# Altium PCB DCF-ECU.PcbDoc
Units mil, origin at the board's own origin, x right, y up, seen from the top; angles counter-clockwise.
Board outline 4560 x 7585 mil, 4 copper layers (Top Layer, GND, 3.3V, Bottom Layer), stack 23.756 mil thick; 22 components, 29 nets, 210 pads, 10 vias.
Unrouted connection lines stored in the file: 2.
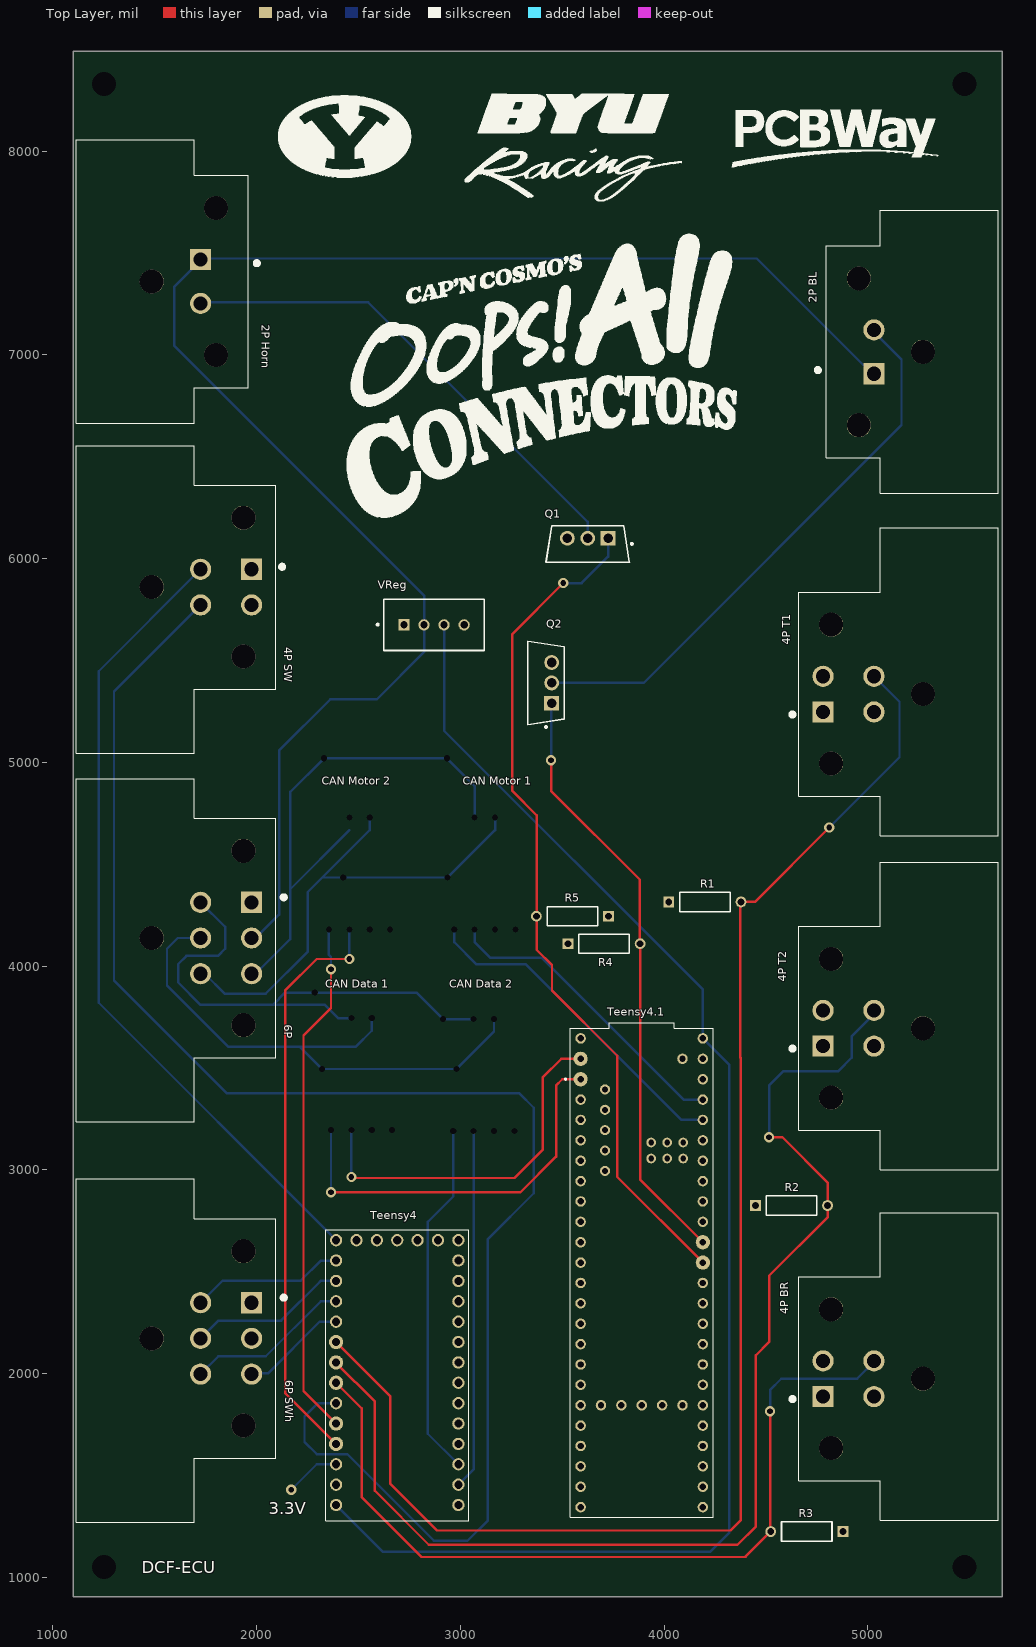
[diagram p0: Top Layer view]
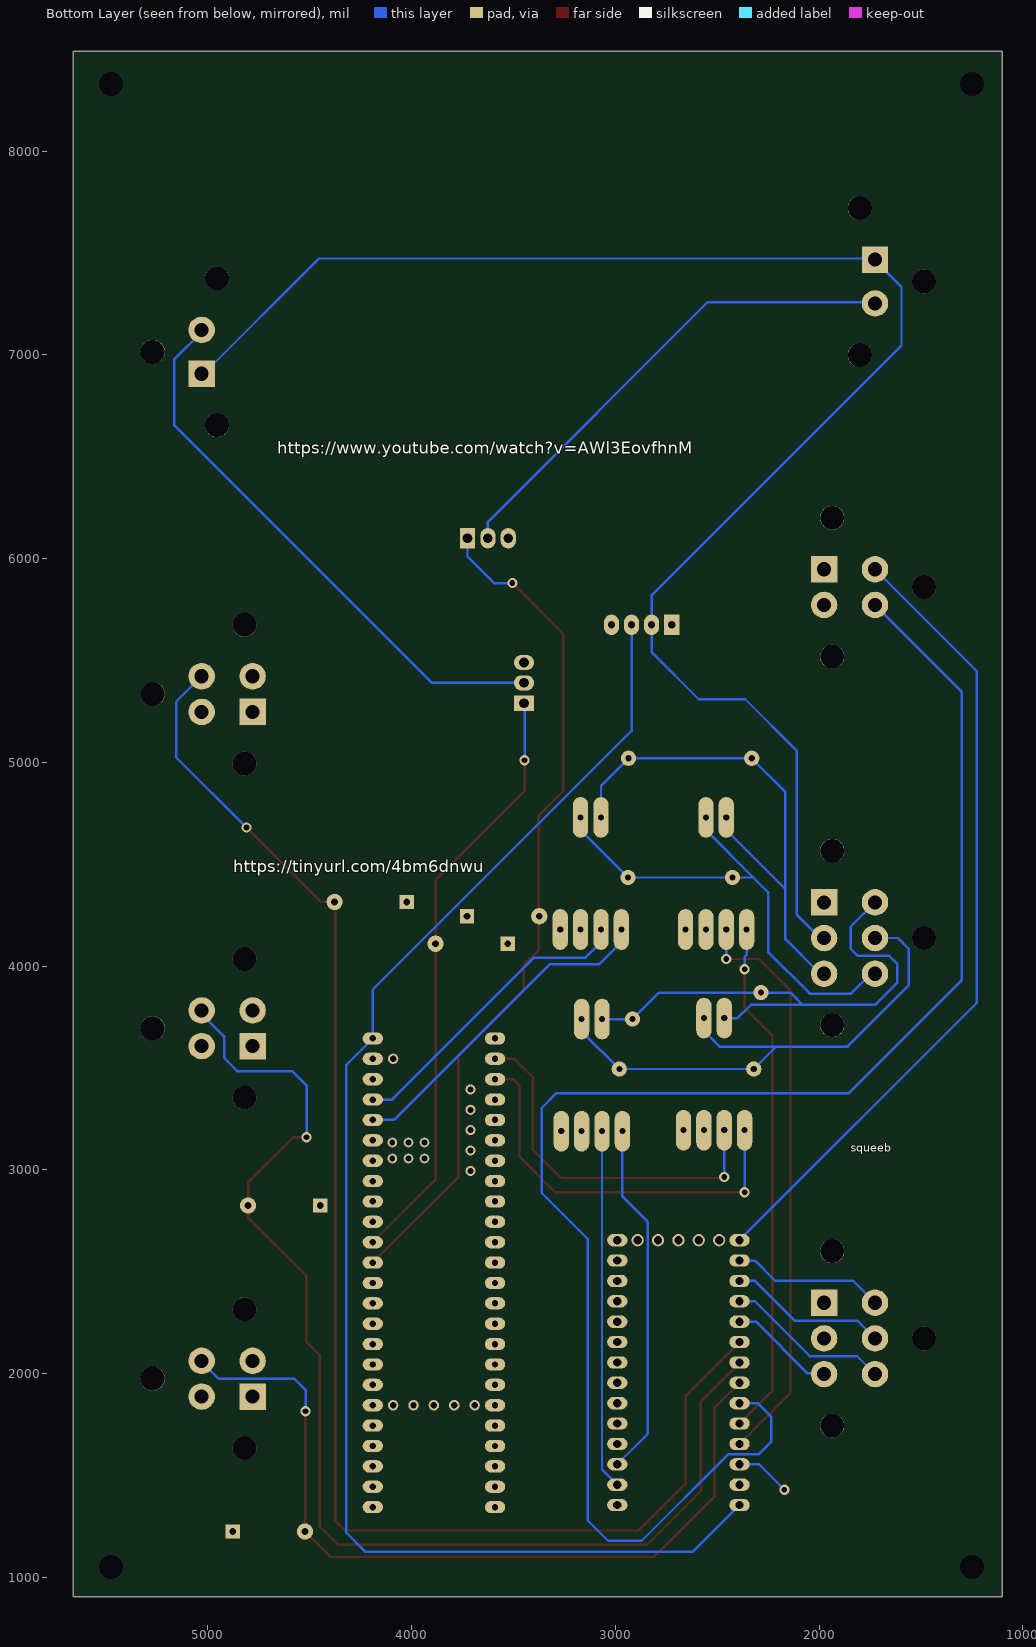
[diagram p1: Bottom Layer view, seen from below]
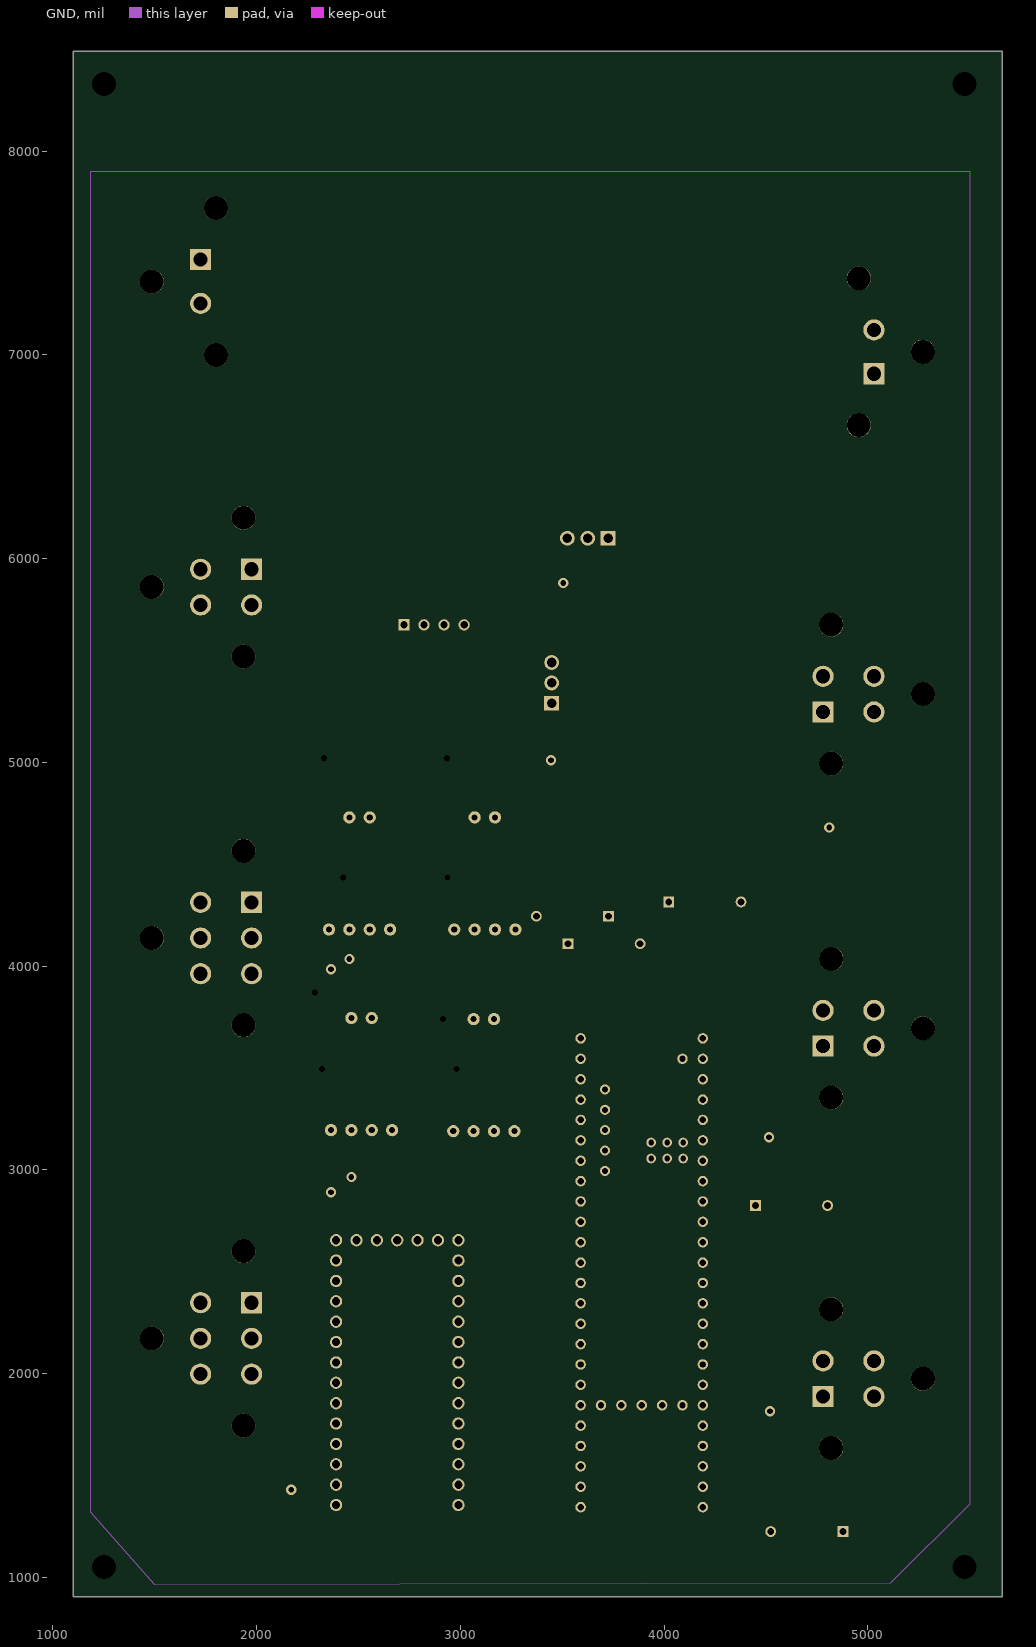
[diagram p2: GND]
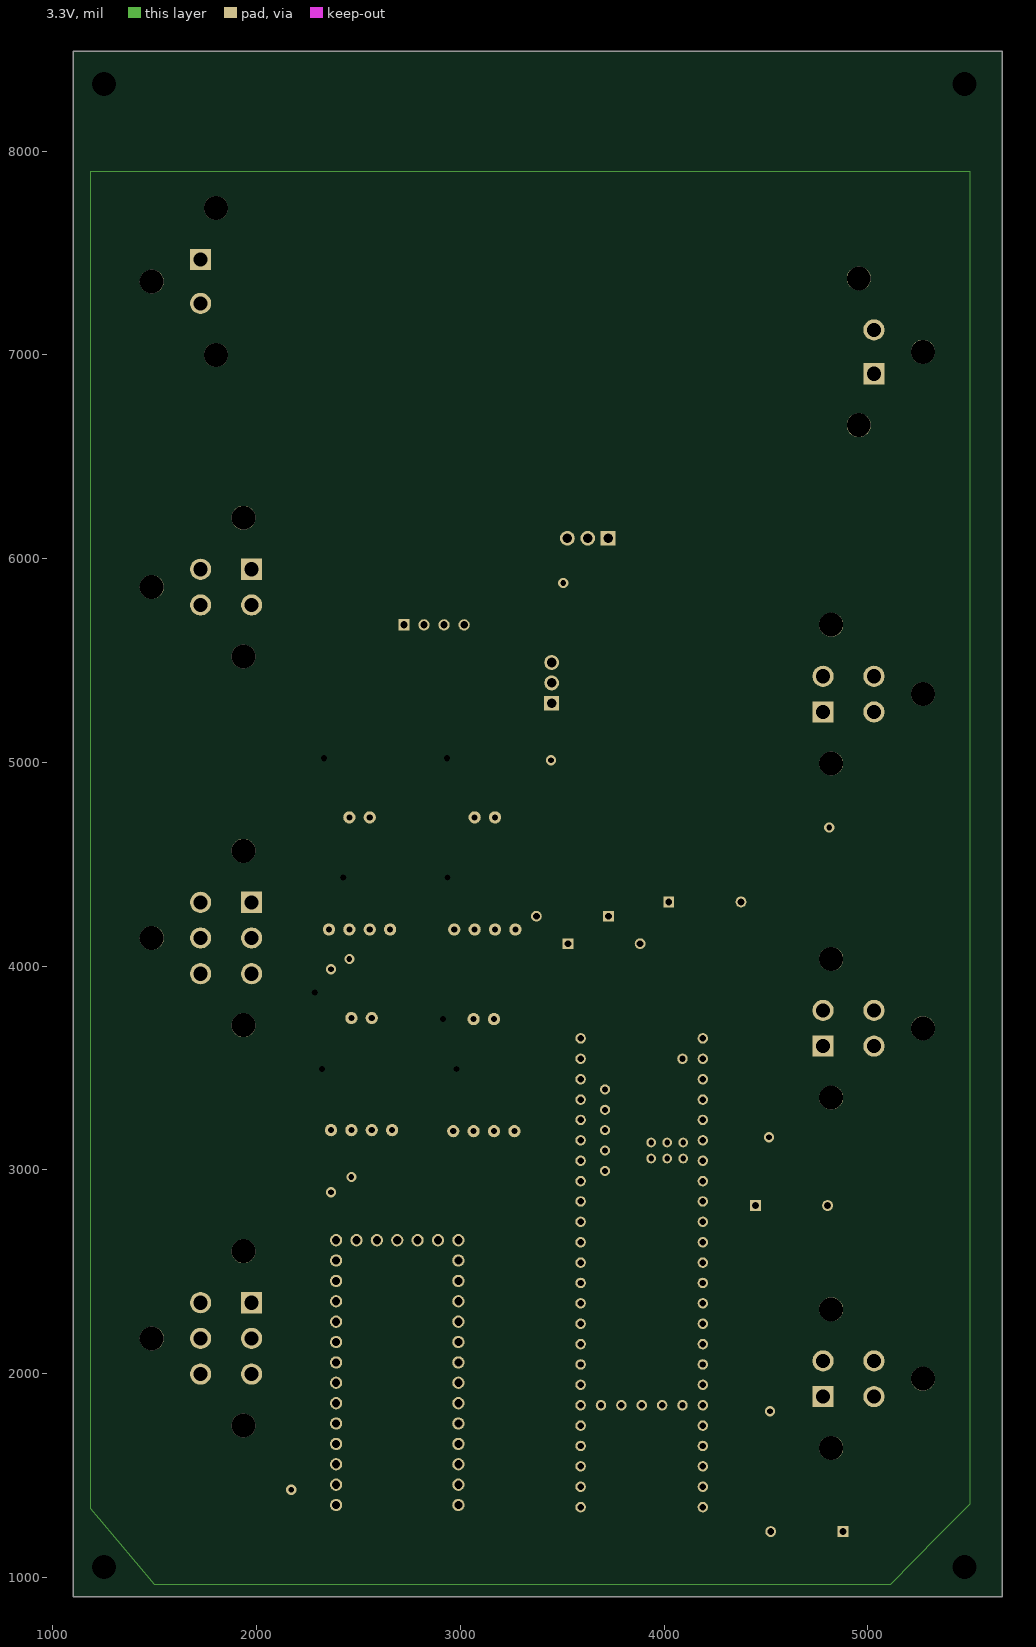
[diagram p3: 3.3V]

## Layer stack, top to bottom
Top Solder: solder mask 0.4, Solder Resist, Dk 3.5
Top Layer: signal copper 1.4
Dielectric 2: prepreg 2.8, PP-006, Dk 4.1
GND: signal copper 1.378
Dielectric 1: dielectric 12.6, FR-4, Dk 4.8
3.3V: signal copper 1.378
Dielectric 3: prepreg 2.8, PP-006, Dk 4.1
Bottom Layer: signal copper 1.4
Bottom Solder: solder mask 0.4, Solder Resist, Dk 3.5

## Board outline
1100,905 5660,905 5660,8490 1100,8490

## Design rules (kind name [scope] priority, off if disabled: settings)
Clearance [All] p1: gap=10 ignorepadtopadclearanceinfootprint=FALSE
HoleSize [All] p1: absolutevalues=TRUE maxlimit=200 minlimit=1 maxpercent=80.000 minpercent=20.000
PolygonConnect [All] p1: connectstyle=Relief reliefconductorwidth=10 reliefentries=4 polygonreliefangle="90 Angle" airgapwidth=10
RoutingVias [All] p1: holewidth=28 width=50 viastyle="Through Hole" minholewidth=28 minwidth=50 maxholewidth=28 maxwidth=50
SolderMaskExpansion [All] p1: expansion=4 istentingtop=FALSE
SupplyNets "Schematic Supply Nets" [InNet('GND')] p1: voltage=0.000
Width [All] p1: maxlimit=20 minlimit=10 preferedwidth=12 minimp=50.000000 maximp=50.000000 favimp=50.000000
29 further rules are at their usual default settings.

## Components (designator, comment, footprint, x,y, rotation, side; value= is the part's Value field where it differs from the comment)
"2P BL" "DT13-2P" TE_DT13-2P 5029.84,7015 r180 top
"2P Horn" "DT13-2P" TE_DT13-2P 1725.16,7360 r0 top
"4P BR" "DT13-4P" TE_DT13-4P 5029.84,1975 r180 top
"4P SW" "DT13-4P" TE_DT13-4P 1725.16,5860 r0 top
"4P T1" "DT13-4P" TE_DT13-4P 5029.84,5335 r180 top
"4P T2" "DT13-4P" TE_DT13-4P 5029.84,3695 r180 top
6P "DT13-6P" TE_DT13-6P 1725.16,4137.95 r0 top
"6P SWh" "DT13-6P" TE_DT13-6P 1725.16,2172.95 r0 top
"CAN Data 1" "CAN Module" "CAN Module-Footprint-1" 2665,3195 r90 top
"CAN Data 2" "CAN Module" "CAN Module-Footprint-1" 3265,3190 r90 top
"CAN Motor 1" "CAN Module" "CAN Module-Footprint-1" 3270,4180 r90 top
"CAN Motor 2" "CAN Module" "CAN Module-Footprint-1" 2655,4180 r90 top
Q1 "IRLZ44NPbF" FP-PG-TO220-3-MFG 3625,6072.24 r270 top
Q2 "IRLZ44NPbF" FP-PG-TO220-3-MFG 3420,5390 r180 top
R1 "MFR-25FBF5210K" RESA60-630X240 4200,4315 r0 top
R2 "MFR-25FBF5210K" RESA60-630X240 4625,2825 r0 top
R3 "MFR-25FBF5210K" RESA60-630X240 4700,1225 r180 top
R4 "MFR-25FBF5210K" RESA60-630X240 3705,4110 r0 top
R5 "MFR-25FBF5210K" RESA60-630X240 3550,4245 r180 top
Teensy4 "DEV-15583" MODULE_DEV-15583 2690,2005 r180 top
Teensy4.1 "DEV-16771" MODULE_DEV-16771 3890,2495 r270 top
VReg "B04B-XASK-1(LF)(SN)" FP-B04B-XASK-1_LF_SN-MFG 2870.79,5675 r180 top

## Footprints (in the part's own frame and the unit in brackets; to place one, negate y for a bottom-side part, rotate by r counter-clockwise, add the part's x,y. Pads: shape width x height; smd on the part's side, far side on the other; paste and mask are expansions set on the pad)
"CAN Module-Footprint-1" [mil]
  round 0 / inner round 60 / far side oval 200x75 hole 30: 1(0,300) 2(0,200) 3(0,100) 4(0,0) 5(550,200) 6(550,100)
FP-B04B-XASK-1_LF_SN-MFG [mm]
  rect 1.4x1.4 / inner rect 1.4x1.4 / far side rect 1.905x2.54 hole 0.9 paste-2539.97: 1(3.75,0)
  round 1.4 / inner round 1.4 / far side oval 1.905x2.54 hole 0.9 paste-2539.97 mask+0: 2(1.25,0) 3(-1.25,0) 4(-3.75,0)
  silkscreen extent -6.25,-3.2 7.15,3.2, body extent -6.35,-3.3 6.35,3.3, height 0.25
FP-PG-TO220-3-MFG [mm]
  rect 1.85x1.85 / inner rect 1.85x1.85 / far side rect 2.54x1.905 hole 1.2 paste-2539.97 mask+0: 1(-0.705,2.54)
  round 1.85 / inner round 1.85 / far side oval 2.54x1.905 hole 1.2 paste-2539.97 mask+0: 2(-0.705,0)
  round 1.85 / inner round 1.85 / far side oval 2.54x1.905 hole 1.2 paste-2539.97: 3(-0.705,-2.54)
  silkscreen extent -2.27,-5.2 2.27,5.63, body extent -2.37,-5.55 2.37,5.55, height 0.25
MODULE_DEV-15583 [mm]
  round 1.53 / inner round 1.53 / far side oval 2.54x1.53 hole 1.02: 0(-7.62,13.97) 1(-7.62,11.43) 2(-7.62,8.89) 3(-7.62,6.35) 3.3V_2(7.62,11.43) 4(-7.62,3.81) 5(-7.62,1.27) 6(-7.62,-1.27) 7(-7.62,-3.81) 8(-7.62,-6.35) 9(-7.62,-8.89) 10(-7.62,-11.43) 11(-7.62,-13.97) 12(-7.62,-16.51) 13(7.62,-16.51) 14(7.62,-13.97) 15(7.62,-11.43) 16(7.62,-8.89) 17(7.62,-6.35) 21(7.62,3.81) G1(-7.62,16.51) G3(7.62,13.97) VIN(7.62,16.51)
  round 1.53 hole 1.02: 3.3V_1(-2.54,-16.51) G2(0,-16.51) ON-OFF(5.08,-16.51) PGM(2.54,-16.51) VBAT(-5.08,-16.51)
  round 1.778 / inner round 1.53 / far side oval 2.54x1.524 hole 1.02: 18(7.62,-3.81) 19(7.62,-1.27) 20(7.62,1.27) 22(7.62,6.35) 23(7.62,8.89)
  silkscreen extent -8.89,-17.78 8.89,18.48
MODULE_DEV-16771 [mm]
  round 1.778 / inner round 1.308 / far side oval 1.524x2.54 hole 0.8: 0(-26.67,-7.62) 1(-24.13,-7.62) 15(-1.27,7.62) 16(-3.81,7.62)
  round 1.308 / inner round 1.308 / far side oval 1.524x2.54 hole 0.8: 2(-21.59,-7.62) 3(-19.05,-7.62) 3.3V_1(6.35,-7.62) 3.3V_2(-24.13,7.62) 4(-16.51,-7.62) 5(-13.97,-7.62) 6(-11.43,-7.62) 7(-8.89,-7.62) 8(-6.35,-7.62) 9(-3.81,-7.62) 10(-1.27,-7.62) 11(1.27,-7.62) 12(3.81,-7.62) 13(3.81,7.62) 14(1.27,7.62) 17(-6.35,7.62) 18(-8.89,7.62) 19(-11.43,7.62) 20(-13.97,7.62) 21(-16.51,7.62) 22(-19.05,7.62) 23(-21.59,7.62) 24(8.89,-7.62) 25(11.43,-7.62) 26(13.97,-7.62) 27(16.51,-7.62) 28(19.05,-7.62) 29(21.59,-7.62) 30(24.13,-7.62) 31(26.67,-7.62) 32(29.21,-7.62) 33(29.21,7.62) 34(26.67,7.62) 35(24.13,7.62) 36(21.59,7.62) 37(19.05,7.62) 38(16.51,7.62) 39(13.97,7.62) 40(11.43,7.62) 41(8.89,7.62) GND1(-29.21,-7.62) GND2(6.35,7.62) GND3(-26.67,7.62) VIN(-29.21,7.62)
  round 1.308 hole 0.8: 3.3V_3(16.51,-2.54) GND4(16.51,0) ON/OFF(16.51,5.08) PROGRAM(16.51,2.54) VBAT(16.51,-5.08) VUSB(-26.67,5.08)
  round 1.258 hole 0.75: 5V(-22.86,-4.57) D+(-17.78,-4.57) D-(-20.32,-4.57) USB_GND1(-15.24,-4.57) USB_GND2(-12.7,-4.57)
  round 1.208 hole 0.7: GND5(-14.24,3.17) LED(-16.24,3.17) R+(-16.24,5.17) R-(-14.24,5.17) T+(-14.24,1.17) T-(-16.24,1.17)
  silkscreen extent -31.18,-9.6 30.48,8.89, body extent -31.18,-8.89 30.48,8.89, height 7.15
RESA60-630X240 [mm] "Axial Resistor, 2-Leads, Dia 2.4mm, Body Length 6.3mm"
  rect 1.35x1.35 / inner rect 1.35x1.35 / far side rect 1.778x1.778 hole 0.85: 1(-4.5,0)
  round 1.35 / inner round 1.35 / far side round 2.032 hole 0.85: 2(4.5,0)
  silkscreen extent -3.15,-1.2 3.15,1.2, body extent -3.15,-1.2 3.15,1.2, height 2.4
TE_DT13-2P [mm]
  rect 2.64x2.64 / inner rect 2.64x2.64 / far side rect 3.302x3.302 hole 1.76: 1(0,2.73)
  round 2.64 / inner round 2.64 / far side round 3.302 hole 1.76: 2(0,-2.73)
  round 2.99 hole 2.99 unplated: ""(-6.1,0) ""(1.9,9.155) ""(1.9,-9.155)
  silkscreen extent -15.5,-17.65 7.25,17.65
TE_DT13-4P [mm]
  rect 2.64x2.64 / inner rect 2.64x2.64 / far side rect 3.302x3.302 hole 1.76: 1(6.35,2.225)
  round 2.64 / inner round 2.64 / far side round 3.302 hole 1.76: 2(6.35,-2.225) 3(0,-2.225) 4(0,2.225)
  round 2.99 hole 2.99 unplated: ""(-6.1,0) ""(5.33,8.65) ""(5.33,-8.65)
  silkscreen extent -15.5,-20.71 10.41,17.64
TE_DT13-6P [mm]
  rect 2.64x2.64 / inner rect 2.64x2.64 / far side rect 3.302x3.302 hole 1.76: 1(6.35,4.45)
  round 2.64 / inner round 2.64 / far side round 3.302 hole 1.76: 2(6.35,0) 3(6.35,-4.45) 4(0,-4.45) 5(0,0) 6(0,4.45)
  round 2.99 hole 2.99 unplated: ""(-6.1,0) ""(5.33,-10.87) ""(5.33,10.87)
  silkscreen extent -15.5,-22.93 10.61,19.87

## Part data
"2P BL" "2P Horn": "DT13 Series, 5.46mm Pitch 2 Way 1 Row Right Angle PCB Header, Solder Termination", Package=None, Availability=Unavailable, DigiKey-Purchase-URL=https://snapeda.com/shop?store=DigiKey&id=1788306, EU_RoHS_Compliance=Compliant, MF="TE Connectivity", MP=DT13-2P, Price=None, SnapEDA_Link=https://www.snapeda.com/parts/DT13-2P/TE%20Connectivity%20Deutsch%20Connectors/view-part/1788306/?ref=snap
"4P BR" "4P SW" "4P T1" "4P T2": "DT13 Series, 4.44mm Pitch 4 Way 2 Row Right Angle PCB Header, Solder Termination", Package=None, Availability=Unavailable, MF="TE Connectivity", MP=DT13-4P, Price=None, SnapEDA_Link=https://www.snapeda.com/parts/DT13-4P/TE%20Connectivity%20Deutsch%20Connectors/view-part/2708791/?ref=snap, TE_purchase_URL=https://www.te.com/usa-en/product-DT13-4P.html?te_bu=Cor&te_type=disp&te_campaign=seda_glo_cor-seda-global-disp-prtnr-fy19-seda-model-bom-cta_sma-317_1&elqCampaignId=32493
6P "6P SWh": "DT13 Series, 4.44mm Pitch 6 Way 2 Row Right Angle PCB Header, Solder Termination", Package=None, Availability=Unavailable, DigiKey-Purchase-URL=https://snapeda.com/shop?store=DigiKey&id=1897474, EU_RoHS_Compliance=Compliant, MF="TE Connectivity", MP=DT13-6P, Price=None, SnapEDA_Link=https://www.snapeda.com/parts/DT13-6P/TE%20Connectivity%20Deutsch%20Connectors/view-part/1897474/?ref=snap
"CAN Data 1" "CAN Data 2" "CAN Motor 1" "CAN Motor 2": library part CMP-00030-00003-1, "CAN waveshare"
Q1 Q2: library part CMP-32901-000488-1, "MOSFET N-CH 55V 47A TO220AB", Case/Package=TO-220, Continuous Drain Current (ID)=47A, Drain to Source Breakdown Voltage=55V, Drain to Source Resistance=35mR, Gate to Source Voltage (Vgs)=16V, Input Capacitance=1.7nF, Max Operating Temperature=175°C, Max Power Dissipation=110W, Min Operating Temperature=-55°C, Threshold Voltage=2V, Drain to Source Voltage (Vdss)=55V, Element Configuration=Single, Halogen Free="Halogen Free", Height=0.6inch, Lead Free="Lead Free", Length=0.414inch, Max Dual Supply Voltage=55V, Mount="Through Hole", Number of Pins=3, Packaging=Rail/Tube, Power Dissipation=110W, Rds On Max=22mR, REACH SVHC="No SVHC", RoHS Compliant=Yes, Turn-Off Delay Time=26ns, Turn-On Delay Time=11ns, Width=0.185inch
R1 R2 R3 R4 R5: library part CMP-1659-00074-2, "Axial Resistor, 10 KOhm, +/- 1%, 0.25 W, -55 to 155 degC, 2-Pin THD, RoHS, Bulk", Case\/Package=Axial, Manufacturer=Yageo, Max Operating Temperature=155degC, Max Power Dissipation=250mW, Min Operating Temperature=-55degC, Package Description="2-Pin Axial Lead, Dia 2.4 mm, Body Length 6.3 mm", Package Quantity=200, Package Reference=MFR-25, Resistance=10KOhm, Temperature Coefficient=100ppm\/degreesC, Tolerance=1%, Voltage Rating=250V, Voltage Rating (DC)=200V, Composition=MetalFilm, Datasheet URL=http://www.yageo.com/documents/recent/Yageo%20LR_MFR_2013.pdf, Datasheet Version=04/2013, Lead Free=LeadFree, Length=0.248inch, Manufacturer URL=http://www.yageo.com/, Military Standard=Not, Mount=ThroughHole, Mounting Technology=ThroughHole, Number of Terminations=2, Packaging=Bulk, Power Rating=250mW, RoHSCompliant=True, Termination=Axial
Teensy4: "RT1062 Teensy 4.0 i.MX ARMÂ® CortexÂ®-M7 MPU Embedded Evaluation Board", Package=None, Digi-Key_Part_Number=1568-DEV-15583-ND, Digi-Key_Purchase_URL=https://www.digikey.com/product-detail/en/sparkfun-electronics/DEV-15583/1568-DEV-15583-ND/10384551?utm_source=snapeda&utm_medium=aggregator&utm_campaign=symbol, MF="SparkFun Electronics", MP=DEV-15583, SnapEDA_Link=https://www.snapeda.com/parts/DEV-15583/SparkFun%20Electronics/view-part/4001229/?ref=snap
Teensy4.1: "RT1062 Teensy 4.1 series ARM® Cortex®-M7 MPU Embedded Evaluation Board", Package=None, Check_prices=https://www.snapeda.com/parts/DEV-16771/SparkFun+Electronics/view-part/?ref=eda, MF="SparkFun Electronics", MP=DEV-16771, SnapEDA_Link=https://www.snapeda.com/parts/DEV-16771/SparkFun+Electronics/view-part/?ref=snap
VReg: library part CMP-17439-000018-1, "CONN HEADER VERT 4POS 2.5MM", Current Rating=3A, Manufacturer=JST, Temperature="-25°C to +85°C", Temperature Range High=+85°C, Temperature Range Low=-25°C, Voltage Rating=250V, Automotive=No, Category=Conn, ComponentLink2Description=Datasheet, ComponentLink2URL=http://www.jst-mfg.com/product/pdf/eng/eXA1.pdf, Conn Gender=Male, Conn Orientation=Straight, Contact Material=Tin,Copper, Device Class L1=Connectors, Device Class L2="Headers and Wire Housings", Device Class L3=unset, Digikey Description="CONN HEADER VERT 4POS 2.5MM", Height=8.8mm, Lead Free=Yes, Manufacturer Part Number=B04B-XASK-1(LF)(SN), Number of Contacts=4, Number of Rows=1, Octopart=https://octopart.com/b04b-xask-1%28lf%29%28sn%29-jst-3990149, Package=B04B-XASK-1(LF)(SN), Pitch=2.5mm, RoHS=TRUE

## Free pads (board coordinates)
  round 60 hole 118.11: 2(1250,1050) 2(1250,8330) 2(5475,1050) 2(5475,8330)
  round 0 / inner round 0 / far side round 75 hole 30: 3(2330,5020) 4(2935,5020) 5(2425,4435) 6(2937.5,4435) 7(2320,3495) 8(2980,3495) 9(2915,3740) 10(2285,3870)

## Via types
v1: diameter 50, hole 28, Top Layer to Bottom Layer, 7 vias
v2: diameter 50/50/50/50 (per signal layer), hole 28, Top Layer to Bottom Layer, 3 vias

## Nets (pads, with @x,y where several pads share a name; then routed paths per layer and width w, separated by ;. In a path a pad name is that pad's centre, name@x,y a point inside that pad or via, vN(x,y) a via of type N, cw(c..) or ccw(c..) an arc to the next point about the centre after c; other vN are vias at no path point)
3.3V: "4P BR.2" "4P SW.2" "4P T1.2" "4P T2.2" "6P SWh.2" "CAN Data 1.4" "CAN Data 2.4" "CAN Motor 1.4" "CAN Motor 2.4" Teensy4.1.3.3V_1 Teensy4.3.3V_2 | length 271.8
  Bottom Layer w12: v2(2170,1430) 2295,1555 Teensy4.3.3V_2
5V: Teensy4.1.VIN Teensy4.VIN VReg.3 | length 7099.5
  Bottom Layer w12: Teensy4.VIN 2620,1125 4225,1125 4320,1220 4320,3515 Teensy4.1.VIN 4190,3885 2920,5155 VReg.3
12V: 6P.2 "2P BL.1" "2P Horn.1" VReg.2 | length 7895.9
  Bottom Layer w12: 6P.2@1995.16,4137.95 2110,4252.8 2110,5058.12 2361.88,5310 2590,5310 2821.57,5541.57 VReg.2 2821.57,5818.43 1595,7045 1595,7332.72 1735.2,7472.91 4454.45,7472.91 5019.84,6907.52
A1: "4P T1.3" R1.2 Teensy4.18 | length 7198.4
  Top Layer w12: Teensy4.18 2655,1890 2655,1460 2885,1230 4325,1230 4375,1280 4375,3549.57 4374.57,3550 4374.57,4312.4 R1.2 4445,4315 v1(4810,4680)
  Bottom Layer w12: v1(4810,4680) 5155,5025 5155,5297.44 5029.84,5422.6
A2: "4P T2.3" R2.2 Teensy4.19 | length 5935.6
  Top Layer w12: Teensy4.19 2390,2053.01 2580,1863.01 2580,1425 2845,1160 4360,1160 4450,1250 4450,2090 4515.43,2155.43 4515.43,2480.43 4802.17,2767.17 R2.2 4802.17,2937.83 4580,3160 v1(4515,3160)
  Bottom Layer w12: v1(4515,3160) 4515,3413.46 4586.54,3485 4855,3485 4920,3550 4920,3655.2 5045,3780.2
A3: "4P BR.3" R3.2 Teensy4.20 | length 4064.9
  Top Layer w12: Teensy4.20 2515,1830 2515,1395 2810,1100 4400,1100 4400,1102.17 R3.2 4521.42,1226.42 4521.42,1813.58 v1(4520,1815)
  Bottom Layer w12: v1(4520,1815) 4520,1920 4575,1975 4947.24,1975 5034.84,2062.6
A4: "4P SW.3" Teensy4.21 | length 7904.3
  Bottom Layer w12: 1725.16,5772.4 1300,5347.24 1300,3930 1855,3375 3290,3375 3360,3305 3360,2885 3135,2660 3135,1280 3035,1180 2870,1180 2445,1605 2295,1605 2234.94,1665.06 2234.94,1788.89 2301.05,1855 Teensy4.21
A5: "6P SWh.3" Teensy4.17 | length 521.4
  Bottom Layer w12: 1975.16,1997.76 1978.53,2001.13 2056.13,2001.13 2310,2255 Teensy4.17
A6: "6P SWh.4" Teensy4.16 | length 812.8
  Bottom Layer w12: 1725.16,1997.76 1812.4,2085 2045,2085 2315,2355 Teensy4.16
A7: "6P SWh.6" Teensy4.14 | length 750.5
  Bottom Layer w12: 1725.16,2348.15 1832.76,2455.76 2215.76,2455.76 2315,2555 Teensy4.14
"BL IN": "2P BL.2" Q2.2 | length 2768.8
  Bottom Layer w12: Q2.2 3900,5390 5165,6655 5165,6977.32 5019.84,7122.48
CANH1: 6P.3 "CAN Motor 1.5" "CAN Motor 2.5" pad.3 pad.4 | length 2556.7
  Bottom Layer w12: 6P.3@1995.16,3962.76 2165,4132.6 2165,4377.5 ; 2455,4667.5 2165,4377.5 ; 3070,4730 3070,4884.83 2935,5019.83 2330,5019.83 2165,4854.83 2165,4377.5
CANH2: 6P.6 "CAN Data 1.5" "CAN Data 2.5" pad.9 pad.10 | length 2615
  Bottom Layer w12: 6P.6 1845,4193.31 1845,4085 1810,4050 1655,4050 1615,4010 1615,3920 1725,3810 2080,3810 ; 2465,3745 2400,3745 2335,3810 2080,3810 ; 3065,3740 pad.9 2785,3870 pad.10 2140,3870 2080,3810
CANL1: 6P.4 "CAN Motor 1.6" "CAN Motor 2.6" pad.5 pad.6 | length 2422.2
  Bottom Layer w12: 6P.4@1745.16,3962.76 1842.91,3865 2045,3865 2250,4070 2250,4362.5 2323.75,4436.25 ; 2555,4730 2555,4667.5 2323.75,4436.25 ; 3170,4730 3170,4667.5 pad.6 pad.5 2325,4435 2323.75,4436.25
CANL2: 6P.5 "CAN Data 1.6" "CAN Data 2.6" pad.7 pad.8 | length 2728.1
  Bottom Layer w12: 6P.5 1612.95,4137.95 1560,4085 1560,3905 1860,3605 2210,3605 ; 2565,3745 2565,3682.5 2487.5,3605 2210,3605 ; 3165,3740 3165,3680 pad.8 pad.7 2210,3605
CRX10: "CAN Motor 2.2" Teensy4.23 | length 2852.8
  Top Layer w12: Teensy4.23 2140,1905 2140,3880 2295,4035 v1(2455,4035)
  Bottom Layer w12: v1(2455,4035) 2455,4180
CRX11: "CAN Motor 1.2" Teensy4.1.23 | length 1502.5
  Bottom Layer w12: 3070,4180 3070,4117.5 3145.5,4042 3398,4042 4095,3345 Teensy4.1.23
CRX20: "CAN Data 2.2" Teensy4.0 | length 1766.1
  Bottom Layer w12: Teensy4.0 3065,1530 3065,3190
CRX21: "CAN Data 1.2" Teensy4.1.0 | length 1807.3
  Top Layer w12: v1(2465,2965) 2470,2960 3265,2960 3405,3100 3405,3455 3495,3545 Teensy4.1.0
  Bottom Layer w12: v1(2465,2965) 2465,3195
CTX10: "CAN Motor 2.1" Teensy4.22 | length 2551.3
  Top Layer w12: v1(2365,3985) 2365,3795 2230,3660 2230,1915 Teensy4.22
  Bottom Layer w12: 2355,4180 2355,4055 2365,4045 v1(2365,3985)
CTX11: "CAN Motor 1.1" Teensy4.1.22 | length 1643.9
  Bottom Layer w12: 2970,4180 2970,4117.5 3077.5,4010 3320,4010 4085,3245 Teensy4.1.22
CTX20: "CAN Data 2.1" Teensy4.1 | length 1748.9
  Bottom Layer w12: 2965,3190 2965,2870 2840,2745 2840,1705 Teensy4.1
CTX21: "CAN Data 1.1" Teensy4.1.1 | length 1964.9
  Top Layer w12: v1(2365,2890) 3295,2890 3470,3065 3470,3415 3500,3445 Teensy4.1.1
  Bottom Layer w12: v1(2365,2890) 2365,3195
D1: "4P SW.4" Teensy4.13 | length 3982.3
  Bottom Layer w12: 1725.16,5947.6 1225,5447.44 1225,3820 Teensy4.13
D2: Q1.1 R5.2 Teensy4.1.15 | length 4189.7
  Top Layer w12: v2(3505,5880) 3255,5630 3255,4860 3375,4740 3375,4080 3449.57,4005.43 3449.57,3880.43 3770,3560 3770,2965 Teensy4.1.15
  Bottom Layer w12: v2(3505,5880) 3595,5880 3725,6010 Q1.1
D3: Q2.1 R4.2 Teensy4.1.16 | length 2954.9
  Top Layer w12: v2(3445,5010) 3445,4860 3880.43,4424.57 3880.43,4111.74 R4.2 3881.97,4109.8 3881.97,2953.03 Teensy4.1.16
  Bottom Layer w12: v2(3445,5010) 3445,5287.24 Q2.1
GND: 6P.1 "4P BR.1" "4P SW.1" "4P T1.1" "4P T2.1" "6P SWh.1" "CAN Data 1.3" "CAN Data 2.3" "CAN Motor 1.3" "CAN Motor 2.3" Q1.3 Q2.3 R1.1 R2.1 R3.1 R4.1 R5.1 Teensy4.1.GND1 Teensy4.G1 VReg.4
"HORN IN": "2P Horn.2" Q1.2 | length 2416.3
  Bottom Layer w12: 1735.2,7257.95 2547.05,7257.95 3625,6180 Q1.2
RX1: "6P SWh.5" Teensy4.15 | length 791.7
  Bottom Layer w12: 1725.16,2172.95 1812.2,2260 2120,2260 ; 2120.03,2259.97 2310,2449.94 2310,2450 2315,2455 Teensy4.15 Teensy4.15@2400,2455
pads on no net: 6P. "2P BL." "2P Horn." "4P BR.4" "4P BR." "4P SW." "4P T1.4" "4P T1." "4P T2.4" "4P T2." "6P SWh." Teensy4.1.2 Teensy4.1.3 Teensy4.1.3.3V_2 Teensy4.1.3.3V_3 Teensy4.1.4 Teensy4.1.5 Teensy4.1.5V Teensy4.1.6 Teensy4.1.7 Teensy4.1.8 Teensy4.1.9 Teensy4.1.10 Teensy4.1.11 Teensy4.1.12 Teensy4.1.13 Teensy4.1.14 Teensy4.1.17 Teensy4.1.18 Teensy4.1.19 Teensy4.1.20 Teensy4.1.21 Teensy4.1.24 Teensy4.1.25 Teensy4.1.26 Teensy4.1.27 Teensy4.1.28 Teensy4.1.29 Teensy4.1.30 Teensy4.1.31 Teensy4.1.32 Teensy4.1.33 Teensy4.1.34 Teensy4.1.35 Teensy4.1.36 Teensy4.1.37 Teensy4.1.38 Teensy4.1.39 Teensy4.1.40 Teensy4.1.41 Teensy4.1.D+ Teensy4.1.D- Teensy4.1.GND2 Teensy4.1.GND3 Teensy4.1.GND4 Teensy4.1.GND5 Teensy4.1.LED Teensy4.1.ON/OFF Teensy4.1.PROGRAM Teensy4.1.R+ Teensy4.1.R- Teensy4.1.T+ Teensy4.1.T- Teensy4.1.USB_GND1 Teensy4.1.USB_GND2 Teensy4.1.VBAT Teensy4.1.VUSB Teensy4.2 Teensy4.3 Teensy4.3.3V_1 Teensy4.4 Teensy4.5 Teensy4.6 Teensy4.7 Teensy4.8 Teensy4.9 Teensy4.10 Teensy4.11 Teensy4.12 Teensy4.G2 Teensy4.G3 Teensy4.ON-OFF Teensy4.PGM Teensy4.VBAT VReg.1

## Polygon pours and split planes (outlines as drawn)
GND on GND "NONET_L02_P003" (solid, shelved, pour order 3): 5500,7900 5500,1360 5110,970 1500,965 1185,1320 1185,1330 1185,7900
3.3V on 3.3V "NONET_L03_P004" (solid, shelved, pour order 4): 1320,7900 5435,7900 5500,7900 5500,7835 5500,1360 5345,1205 5110,965 1500,965 1227.5,1287.5 1185,1337.8 1185,7900

## Silkscreen, mask and mechanical layers (free items; w line width, h text height)
Top Overlay:
  drawing of 40 lines, arcs and shapes, not listed
  text "3.3V" at 2060,1310 h60
  text "DCF-ECU" at 1435,1020 h60
Bottom Overlay:
  text "https://www.youtube.com/watch?v=AWl3EovfhnM" at 4660,6514.99 h60
  text "https://tinyurl.com/4bm6dnwu" at 4875,4459.99 h60
  text "squeeb" at 1845,3088.33 h40

## Text inside footprints (layer, text, board x,y; h text height)
Teensy4.1: Mechanical 13 "Teensy 4.1" at 3903.39,2504.84 h40 r270